# Altium PCB RF_v2.PcbDoc (part 3 of 4)
Units mm, origin at the board's own origin, x right, y up, seen from the top; angles counter-clockwise.
Board outline 203.1 x 72.1 mm, 2 copper layers (Top Layer, Bottom Layer), stack 1.535 mm thick; 384 components, 237 nets, 1087 pads, 1621 vias.
Unrouted connection lines stored in the file: 4.
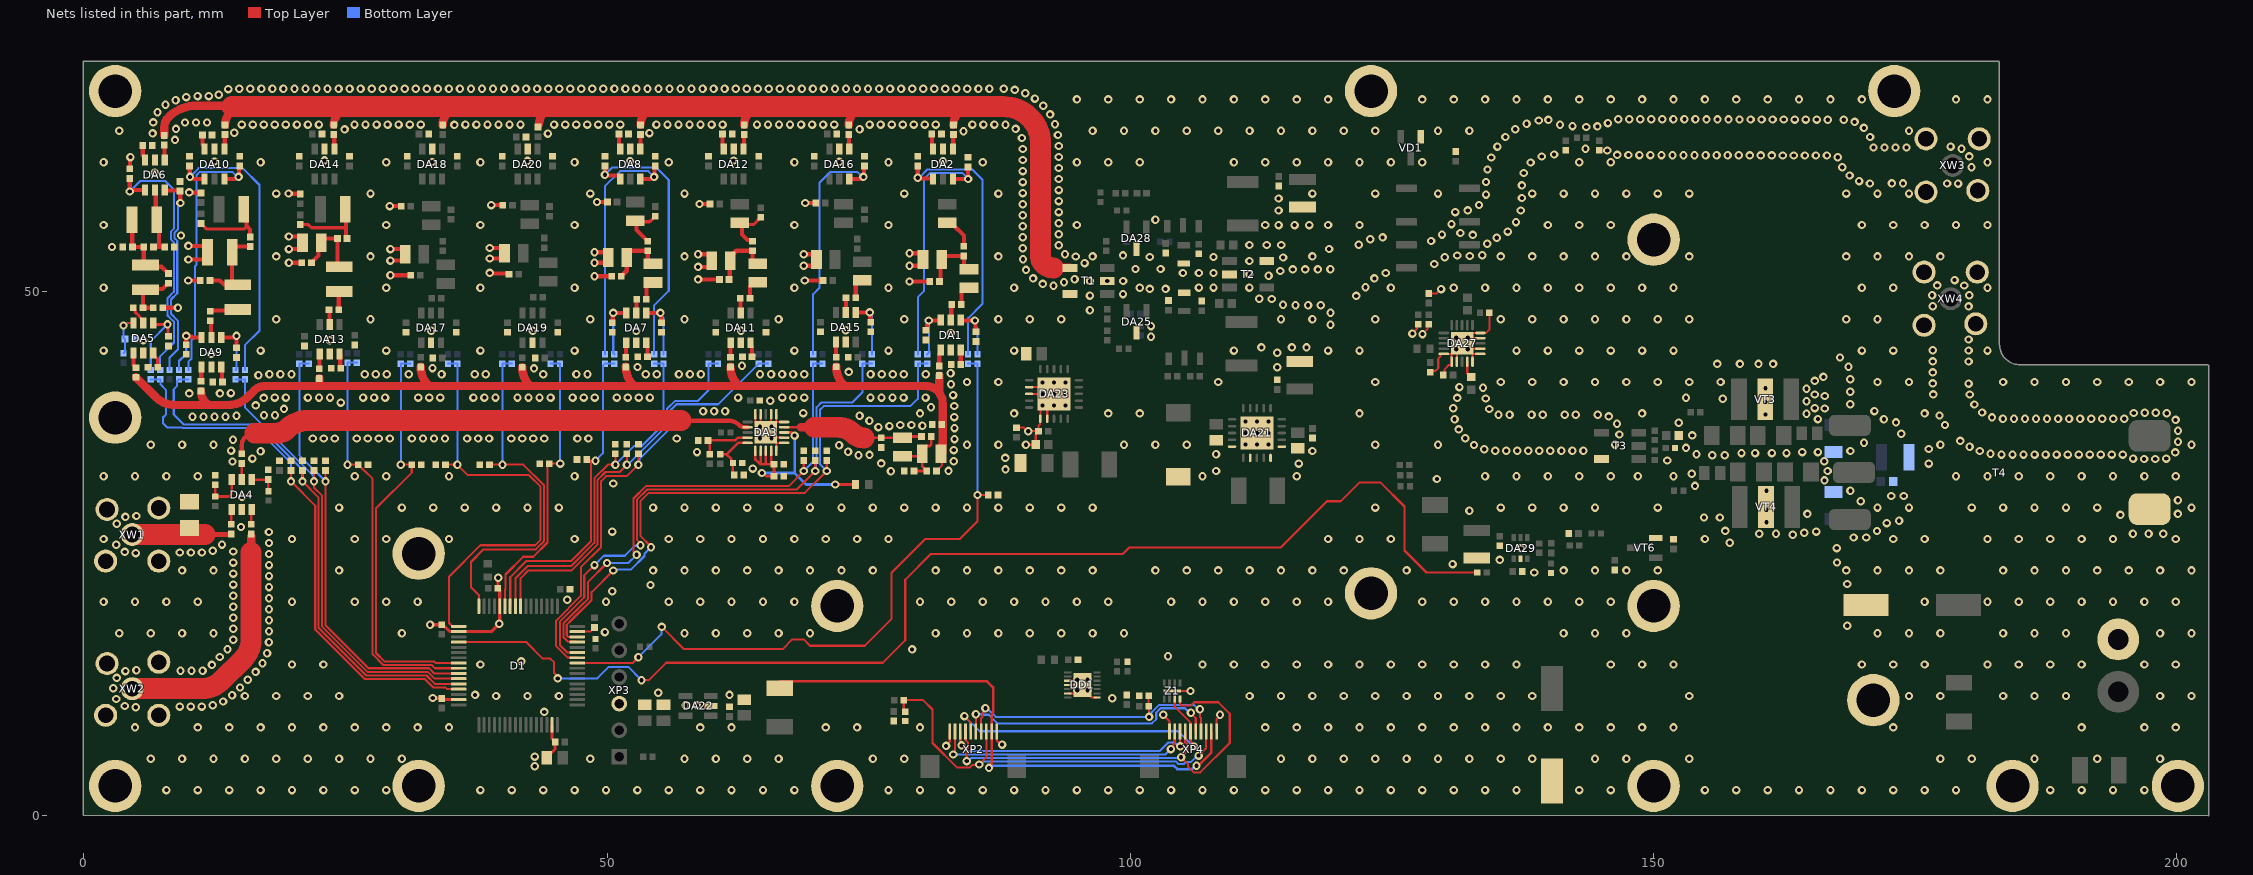
[diagram p2: the nets of this part, all layers, seen from the top]

## Via types
v1: diameter 0.8, hole 0.4, Top Layer to Bottom Layer, tented both sides, 1579 vias
v2: diameter 0.8, hole 0.4, Top Layer to Bottom Layer, 42 vias

## Nets (pads, with @x,y where several pads share a name; then routed paths per layer and width w, separated by ;. In a path a pad name is that pad's centre, name@x,y a point inside that pad or via, vN(x,y) a via of type N, cw(c..) or ccw(c..) an arc to the next point about the centre after c; other vN are vias at no path point) (continued)
BAND0_EN: C73.2 D1.29 R12.2 R15.1 | length 53.2
  Top Layer w0.2: C73.2@19.8,32.94 v1(19.8,31.9) 22.125,29.575 22.125,17.754 26.854,13.025 32.575,13.025 33.375,12.225 34.553,12.225 34.728,12.05 D1.29@35.83,12.05
  Bottom Layer w0.2: R12.2@6.4,41.65 R15.1@7.3,41.65 7.331,41.619 7.331,41.167 7.875,40.623 7.875,38.307 7.575,38.007 7.575,37.441 7.954,37.062 9.374,37.062 9.425,37.011 16.448,37.011 19.793,33.667 19.793,31.907 v1(19.8,31.9)
BAND1_DIS: C191.2 D1.28 R23.2 R24.1 | length 51.4
  Top Layer w0.2: C191.2@20.9,32.94 v1(20.9,31.9) 22.45,30.35 22.45,17.888 26.988,13.35 32.754,13.35 33.554,12.55 D1.28@35.83,12.55
  Bottom Layer w0.2: R24.1@10,41.65 R23.2@9.1,41.65 8.9,41.45 8.9,41 8.6,40.7 8.6,38.296 9.559,37.336 16.583,37.336 20.9,33.019 v1(20.9,31.9)
BAND1_EN: C74.2 D1.27 R19.2 R25.1 | length 43.7
  Top Layer w0.2: C74.2@22,32.94 22,31.3 22.775,30.525 22.775,18.023 27.098,13.7 32.878,13.7 33.528,13.05 D1.27@35.83,13.05
  Bottom Layer w0.2: R19.2@14.5,41.65 R25.1@15.4,41.65 15.4,38.979 21.944,32.434 21.944,31.956 v1(22,31.9)
BAND2_DIS: C192.2 D1.26 R72.2 R73.1 | length 42.6
  Top Layer w0.2: C192.2@23.1,32.94 v1(23.1,31.9) 23.1,18.158 27.208,14.05 33.003,14.05 33.503,13.55 D1.26@35.83,13.55
  Bottom Layer w0.2: R72.2@21.5,43.15 R73.1@20.6,43.15 20.6,34.4 v1(23.1,31.9)
BAND2_EN: C120.2 D1.25 R43.2 R74.1 | length 39.2
  Top Layer w0.2: v1(25.2,33.5) C120.2@26.24,33.5 26.615,33.125 26.615,33.087 26.747,32.955 26.785,32.955 27.6,32.14 27.6,15.367 28.592,14.375 33.225,14.375 33.55,14.05 D1.25@35.83,14.05
  Bottom Layer w0.2: v1(25.2,33.5) R74.1@25.2,43.25 R43.2@26.1,43.25
BAND3_DIS: C193.2 D1.24 R78.2 R79.1 | length 38.9
  Top Layer w0.2: v1(30.3,33.5) C193.2@31.34,33.5 31.34,32.74 27.925,29.325 27.925,15.502 28.727,14.7 33.471,14.7 33.621,14.55 D1.24@35.83,14.55
  Bottom Layer w0.2: 30.3,33.9 R79.1@30.3,43.15 R78.2@31.2,43.15
BAND3_EN: C184.2 D1.17 R76.2 R80.1 | length 41.3
  Top Layer w0.2: C184.2@34.56,33.5 v1(35.7,33.5) 36.7,32.5 42.54,32.5 43.659,31.381 43.659,26.331 43.129,25.8 37.9,25.8 34.9,22.8 34.9,18.375 35.225,18.05 D1.17@35.83,18.05
  Bottom Layer w0.2: R80.1@34.8,43.15 R76.2@35.7,43.15 v1(35.7,33.5)
BAND4_DIS: C194.2 D1.16 R82.2 R83.1 | length 34.3
  Top Layer w0.2: D1.16@37.75,19.97 37.75,21.05 37,21.8 37,24.2 38.2,25.4 43.188,25.4 43.984,26.196 43.984,31.516 42,33.5 v1(40.011,33.5) C194.2@38.771,33.5
  Bottom Layer w0.2: v1@40,33.5 R83.1@40,43.15 R82.2@40.9,43.15
BAND4_EN: C185.2 D1.11 R81.2 R84.1 | length 27.6
  Top Layer w0.2: D1.11@40.25,19.97 40.25,21.55 40.3,21.6 40.3,23 42,24.7 42.948,24.7 44.309,26.061 C185.2@44.309,33.6 ; C185.2@44.332,33.449 C185.2@44.483,33.6 v1(45.523,33.6)
  Bottom Layer w0.2: R84.1@44.6,43.15 R81.2@45.5,43.15 v1@45.5,33.6
BAND5_DIS: C195.2 D1.10 R17.2 R18.1 | length 31
  Top Layer w0.2: D1.10@40.75,19.97 40.75,22.75 42.3,24.3 46.6,24.3 48.46,26.16 48.46,33.881 48.179,33.881 C195.2@48.06,34 ; 48.48,33.881 v1(48.9,33.881)
  Bottom Layer w0.2: v1(48.9,33.881) 49.6,34.581 49.6,42.95 R18.1@49.8,43.15 R17.2@50.7,43.15
BAND5_EN: C186.2 D1.9 R16.2 R22.1 | length 34.3
  Top Layer w0.2: D1.9@41.25,19.97 41.25,22.65 42.4,23.8 46.56,23.8 48.785,26.025 48.785,32.185 50.1,33.5 v1(50.8,33.5) C186.2@50.8,34.54
  Bottom Layer w0.2: v1(50.8,33.5) 52.6,35.3 53.339,35.3 55.4,37.361 R16.2@55.4,43.15 R22.1@54.5,43.15
BAND6_DIS: C196.2 D1.8 R41.2 R42.1 | length 37.1
  Top Layer w0.2: D1.8@41.75,19.97 41.75,22.65 42.5,23.4 46.619,23.4 49.11,25.891 49.11,32.05 49.86,32.8 51.2,32.8 v1(51.9,33.5) C196.2@51.9,34.54
  Bottom Layer w0.2: v1(51.9,33.5) 51.998,33.5 55.725,37.227 55.725,38.812 56.508,39.596 58.696,39.596 59.7,40.6 R42.1@59.7,43.15 R41.2@60.6,43.15
BAND6_EN: C187.2 D1.58 R31.2 R70.1 | length 42.9
  Top Layer w0.2: D1.58@47.17,15.05 47.13,15.09 46.216,15.09 45.143,16.163 45.143,18.6 47.5,20.957 47.5,23.7 49.435,25.635 49.435,31.916 49.919,32.4 51.9,32.4 v1(53,33.5) C187.2@53,34.54
  Bottom Layer w0.2: v1(53,33.5) 53.086,33.586 53.086,34.03 56.05,36.995 56.05,38.678 56.643,39.271 60.621,39.271 R70.1@64.5,43.15 R31.2@65.4,43.15
BAND7_DIS: C197.2 D1.61 R21.1 R75.2 | length 48.9
  Top Layer w0.2: D1.61@47.161,16.559 47.13,16.59 46.268,16.59 45.826,17.032 45.826,18.328 47.604,20.106 48.2,20.702 48.2,22.3 v1(50,24.1) ; v1(52.825,24.9) 52.525,25.2 52.525,30.265 53.714,31.455 67.355,31.455 v1(68.8,32.9) C197.2@68.8,33.9
  Bottom Layer w0.2: v1(50,24.1) 52.025,24.1 v1(52.825,24.9) ; v1(68.8,32.9) 69.7,33.8 R21.1@69.7,43.15 R75.2@70.6,43.15
BAND7_EN: C188.2 D1.59 R20.2 R77.1 | length 54.6
  Top Layer w0.2: D1.59@47.17,15.55 46.216,15.55 45.501,16.264 45.501,18.499 47.825,20.822 47.825,22.925 v1(48.8,23.9) ; v1(53.2,25.8) 53.2,25.962 52.85,26.312 52.85,30.131 53.849,31.13 68.13,31.13 v1(69.9,32.9) C188.2@69.9,33.9
  Bottom Layer w0.2: v1(48.8,23.9) 49.7,24.8 51.7,24.8 52.655,25.755 53.155,25.755 v1(53.2,25.8) ; v1(69.9,32.9) 69.96,32.96 69.96,33.6 70.025,33.665 70.025,38.994 70.469,39.438 73.438,39.438 74.4,40.4 R77.1@74.4,43.15 R20.2@75.3,43.15
BAND8_DIS: C198.2 D1.62 R10.2 R11.2 | length 58.8
  Top Layer w0.2: D1.62@47.169,17.049 46.269,17.049 46.151,17.167 46.151,18.194 46.611,18.653 48.525,20.567 48.525,21.322 v1(50.592,23.389) ; v1(54.2,25.6) 54.2,25.684 53.189,26.694 53.189,30.011 53.983,30.805 68.905,30.805 v1(71,32.9) C198.2@71,33.9
  Bottom Layer w0.2: v1(50.592,23.389) 50.703,23.5 52.309,23.5 53.585,24.776 53.585,24.985 v1(54.2,25.6) ; v1(71,32.9) 70.35,33.55 70.35,38.735 70.703,39.087 78.987,39.087 79.7,39.8 R11.2@79.7,43.15 R10.2@80.6,43.15
BAND8_EN: C189.2 D1.57 R1.2 R2.2 | length 66.1
  Top Layer w0.2: D1.57@47.17,14.55 52.45,14.55 v1(53,15.1) ; v1(55.225,18) 57.35,15.875 66.775,15.875 67.7,16.8 68.8,16.8 69.4,16.2 74.64,16.2 77.2,18.76 77.2,23.2 80.4,26.4 83.7,26.4 85.4,28.1 v1(85.4,30.6) C189.2@86.44,30.6
  Bottom Layer w0.2: v1(53,15.1) 55.2,17.3 55.2,17.975 v1(55.225,18) ; R2.2@84.5,43.15 R1.2@85.4,43.15 v1(85.4,30.6)
BPF_IN: C1.2 C13.1 C20.2 C26.2 C31.2 C47.2 C62.2 C67.2 C72.2 C119.2 C170.2 L7.2 | length 99.8
  Top Layer w0.2: C13.1@81.484,32.893 81.992,33.401 L7.2@81.992,34.621
  Top Layer w0.8: C26.2@5,41.84 6.896,39.944 ccw(c8.692,41.74) 8.692,39.2 11.882,39.2 ; C47.2@11.2,40.54 ccw(c12.789,40.54) 11.665,39.417 11.882,39.2 ; 22.5,41.021 C72.2@22.5,41.74 ; C119.2@32.2,42.84 ccw(c34.66,42.84) 32.921,41.1 ; 32.921,41.1 33,41.021 ; C170.2@41.9,42.8 ccw(c44.36,42.8) 42.621,41.06 ; C31.2@51.8,42.84 ccw(c54.26,42.84) 52.521,41.1 ; C62.2@61.8,42.84 ccw(c64.26,42.84) 62.521,41.1 ; C67.2@71.9,42.85 ccw(c74.36,42.85) 72.621,41.11 ; 81.75,40.455 C1.2@81.75,42.015 ; L7.2@81.915,34.544 81.992,34.621 82.025,34.654 82.025,35.437 82.091,35.503 C20.2@82.091,37.239 ; C20.2@82.073,37.419 82.073,39.37 ccw(c80.422,39.37) 80.422,41.021 33,41.021 ; 11.882,39.2 13.848,39.2 ccw(c13.848,41.74) 15.644,39.944 16.3,40.6 cw(c17.316,39.584) 17.316,41.021 17.421,41.021 23.53,41.021 23.836,41.021 33,41.021
BPF_OUT: C4.1 C27.1 C34.1 C48.1 C52.1 C70.1 C75.1 C121.1 C171.1 T1.5 | length 112.1
  Top Layer w0.8: C27.1@7.7,64.96 7.7,65.734 cw(c9.066,65.734) 8.1,66.7 cw(c10.737,64.063) 10.737,67.792 13.506,67.792 13.975,67.324 13.975,67.107 ccw(c15.122,65.96) C48.1@13.5,65.96 ; C75.1@23.9,65.96 cw(c25.522,65.96) 24.375,67.107 ; C121.1@34.3,65.96 cw(c35.922,65.96) 34.775,67.107 ; C171.1@43.5,66 cw(c45.122,66) 43.975,67.147 ; C34.1@53.2,65.96 cw(c54.822,65.96) 53.675,67.107 ; C52.1@63.1,65.96 cw(c64.722,65.96) 63.575,67.107 ; C70.1@73.1,65.96 cw(c74.722,65.96) 73.575,67.107 ; C4.1@83.1,65.96 cw(c84.722,65.96) 83.575,67.107 ; 92.656,52.304 T1.5@94.242,52.304
  Top Layer w2: 14.178,67.71 24.375,67.71 34.775,67.71 43.975,67.71 53.675,67.71 63.575,67.71 73.575,67.71 83.575,67.71 87.89,67.71 cw(c87.89,64.16) 91.44,64.16 91.44,53.328 ccw(c92.328,53.328) 91.7,52.7 ccw(c92.656,53.656) 92.656,52.304
CON_RS422A: XP2.2 XP4.2 | length 25.1
  Top Layer w0.2: v1(83.082,5.801) 83.082,5.964 83.25,6.132 XP2.2@83.25,8 ; v1(103.875,6.325) 103.875,6.337 104.125,6.587 104.125,6.834 104.25,6.959 XP4.2@104.25,8
  Bottom Layer w0.2: v1(83.082,5.801) 103.339,5.801 103.863,6.325 v1(103.875,6.325)
CON_RS422B: XP2.3 XP4.3 | length 24.5
  Top Layer w0.2: XP2.3@83.725,8.025 XP2.3@83.75,8 83.75,6.962 83.875,6.837 v1(83.875,6.675) ; XP4.3@104.75,8 104.757,7.993 104.757,6.586 v1(104.764,6.579)
  Bottom Layer w0.2: v1(83.875,6.675) 84.424,6.126 102.792,6.126 103.616,6.95 104.231,6.95 104.602,6.579 v1(104.764,6.579)
CON_RS422Y: XP2.5 XP4.5 Z1.3 | length 30.2
  Top Layer w0.2: v1(84.15,9.475) 84.738,8.887 84.738,8.012 XP2.5@84.75,8 ; Z1.3@104.25,11.11 104.25,10.364 105.733,8.882 105.733,8.017 105.775,7.975 105.775,7.051 106.089,6.737 v1(106.089,6.575)
  Bottom Layer w0.2: v1(84.15,9.475) 85.6,8.025 104.564,8.025 106.014,6.575 v1(106.089,6.575)
CON_RS422Z: XP2.4 XP4.4 Z1.4 | length 41.6
  Top Layer w0.2: XP2.4@84.25,8 84.275,7.975 84.275,7.159 84.5,6.934 84.5,6.416 84.375,6.291 v1(84.375,5.176) ; Z1.4@104.75,11.11 104.75,10.617 104.867,10.5 105.8,10.5 106.1,10.8 108.4,10.8 109.5,9.7 109.5,6.9 106.7,4.1 106.066,4.1 105.528,4.638 105.528,4.872 104.875,5.525 v1@104.875,5.543 ; v1(104.859,5.543) v1@104.875,5.543 ; XP4.4@105.25,8 105.25,6.977 105.464,6.764 105.464,6.164 104.875,5.575 v1@104.875,5.543
  Bottom Layer w0.2: v1(84.375,5.176) 84.492,5.176 84.792,5.476 104.792,5.476 v1(104.859,5.543)
CON_TX_FAIL: R36.1 R37.1 XP2.8 XP4.8 | length 40.6
  Top Layer w0.2: R37.1@78.5,9.9 78.35,10.05 R36.1@78.35,11 80.2,11 81.1,10.1 81.1,6.899 83.448,4.551 84.634,4.551 84.875,4.792 85.516,4.792 v1(85.575,4.851) 86.25,5.526 XP2.8@86.25,8 ; v1(106.525,5.7) 107.25,6.425 XP4.8@107.25,8
  Bottom Layer w0.2: v1(85.575,4.851) 85.692,4.851 85.992,5.151 104.328,5.151 104.579,4.9 105.099,4.9 105.274,5.075 105.791,5.075 106.416,5.7 v1(106.525,5.7)
CON_TXON: R68.1 R69.1 XP2.7 XP4.7 | length 28.2
  Top Layer w0.2: XP2.7@85.75,8 85.75,9.266 85.875,9.391 85.875,9.808 86.15,10.083 v1(86.15,10.225) ; R69.1@101.757,11.419 R68.1@101.757,10.403 101.8,10.36 v1(101.8,9.4) ; v1(106.65,10.13) 106.65,9.399 106.75,9.299 XP4.7@106.75,8
  Bottom Layer w0.2: v1(86.15,10.225) 86.312,10.225 87.137,9.4 v1(101.8,9.4) 101.8,9.562 102.05,9.812 102.05,9.844 102.756,10.55 106.08,10.55 106.5,10.13 v1(106.65,10.13)
DAC_DRV: D1.20 R26.1 | length 117.7
  Top Layer w0.2: D1.20@35.83,16.55 42.29,16.55 43.868,14.972 44.584,14.972 44.95,14.606 44.95,13.587 45.3,13.237 v1(45.3,13.075) ; v1(53.3,12.9) 53.316,12.916 54,12.916 55.659,14.575 66.403,14.575 75.773,14.575 76.354,14.575 78.5,16.721 78.5,22.52 80.955,24.975 99.301,24.975 99.926,25.6 114.4,25.6 118.8,30 120.1,30 121.908,31.808 123.892,31.808 126.2,29.5 126.2,25.3 128.3,23.2 R26.1@133.15,23.2
  Bottom Layer w0.2: v1(45.3,13.075) 49.075,13.075 50.183,14.183 52.017,14.183 v1(53.3,12.9)
DRV_IN: C152.2 DA27.14 | length 1.8
  Top Layer w0.2: C152.2@132.25,42.175 132.55,41.875 C152.2@132.575,41.875
  Top Layer w0.25: DA27.14@132.199,43.335 132.199,42.226 C152.2@132.4,42.025
GND: C5.2 C6.1 C7.2 C8.2 C9.1 C10.1 C14.1 C15.1 C18.1 C19.1 C20.1 C21.2 C22.2 C23.2 C24.2 C25.2 C28.2 C30.1 C37.1 C38.1 C39.1 C40.1 C41.2 C42.2 C43.2 C44.2 C45.2 C46.1 C49.2 C55.1 C56.1 C57.2 C58.2 C59.2 C60.2 C61.1 C63.2 C64.2 C65.2 C66.2 C69.2 C71.1 C73.1 C74.1 C76.2 C77.2 C78.2 C81.1 C82.2 C83.2 C84.2 C85.2 C86.1 C87.2 C88.2 C89.2 C91.1 C92.2 C93.1 C94.1 C95.1 C96.1 C97.1 C98.2 C99.2 C100.1 C101.1 C102.1 C103.1 C104.1 C105.1 C106.1 C107.1 C108.1 C109.1 C110.1 C111.1 C112.1 C113.1 C114.1 C115.2 C116.2 C117.2 C118.1 C120.1 C122.1 C123.2 C125.2 C129.2 C130.2 C133.1 C134.1 C136.1 C137.1 C138.1 C140.1 C141.1 C144.1 C145.1 C147.2 C148.2 C149.1 C150.2 C151.2 C153.1 C154.1 C156.2 C157.1 C158.1 C161.1 C162.1 C163.2 C164.2 C165.1 C166.2 C167.2 C168.2 C169.2 C172.2 C175.1 C176.1 C177.2 C178.2 C179.2 C180.2 C184.1 C185.1 C186.1 C187.1 C188.1 C189.1 C190.1 C191.1 C192.1 C193.1 C194.1 C195.1 C196.1 C197.1 C198.1 C199.1 C201.1 C204.1 C205.1 C207.1 C208.2 C209.2 C210.2 D1.12 D1.18 D1.31 D1.47 D1.63 DA1.2 DA2.2 DA3.10 DA3.11 DA3.12 DA3.15 DA3.16 DA3.17 DA3.19 DA3.20 DA3.21 DA4.2 DA5.2 DA6.2 DA7.2 DA8.2 DA9.2 DA10.2 DA11.2 DA12.2 DA13.2 DA14.2 DA15.2 DA16.2 DA17.2 DA18.2 DA19.2 DA20.2 DA21.5 DA21.7 DA21.10 DA21.11 DA21.21 DA22.2 DA23.7 DA23.8 DA23.11 DA23.12 DA23.21 DA25.3 DA27.10 DA27.11 DA27.12 DA27.15 DA27.16 DA27.17 DA27.19 DA27.20 DA27.21 DA28.3 DA29.2 DD1.3 DD1.4 DD1.6 DD1.8 DD1.15 L4.1 L12.1 L14.2 L17.2 L22.2 L23.1 L26.2 L29.2 pad.1 R3.1 R7.2 R33.1 R37.2 R38.2 R40.2 R47.2 R48.1 R49.1 R50.1 R55.2 R63.2 R67.2 R69.2 R71.2 T1.2 T1.4 T2.2 T2.4 T3.4 T4.5 VD1.1 VT3.2 VT4.2 VT6.2 XP1.2 XP2.1 XP2.6 XP2.10 XP3.3 XP4.1 XP4.6 XP4.10 XW1.2 XW2.2 XW3.2 XW4.2 Z1.9 | length 152
  Top Layer w0.2: D1.63@47.17,17.55 48.41,17.55 C109.1@48.8,17.94 ; DA3.20@64.177,38.326 64.177,37.576 v2(64.627,37.126) 64.677,37.176 DA3.19@64.677,38.326 ; DA3.17@65.677,38.326 65.677,37.176 v2(65.727,37.126) ; v2(65.727,36.026) 65.777,36.076 DA3.12@66.927,36.076 ; DA3.10@66.177,34.826 66.177,35.576 DA3.11@66.927,35.576 ; DA3.16@66.177,38.326 66.177,37.576 DA3.15@66.927,37.576 ; v1(82.4,6.625) 82.4,6.669 82.75,7.019 XP2.1@82.75,8 ; XP2.6@85.25,8 v1(85.25,9.65) ; XP2.10@87.25,8 87.262,7.988 87.262,7.113 87.624,6.751 v1(87.75,6.751) ; C105.1@89.125,37.035 89.833,37.035 90.168,36.7 v1(90.25,36.7) 90.253,36.703 C103.1@91.234,36.703 ; v1(90.019,35.402) 90.936,35.402 C102.1@90.967,35.433 90.967,36.436 C103.1@91.234,36.703 ; DA23.8@90.335,40.259 v2(91.61,40.259) ; DA23.7@90.335,40.909 92.06,40.909 v2(92.71,40.259) ; DA23.12@92.06,37.884 92.06,38.784 91.685,39.159 v2(91.61,39.159) 91.41,38.959 DA23.11@91.41,37.884 91.41,37.595 91.375,37.56 91.375,37.35 91.234,37.209 C103.1@91.234,36.703 ; DD1.6@94.03,11.65 94.68,11.65 94.925,11.895 v2(94.925,11.95) ; DD1.4@94.03,12.45 DD1.15@95.425,12.45 ; DD1.3@94.03,12.85 94.825,12.85 v2(94.925,12.95) ; v2(95.925,11.95) 95.925,11.645 96.17,11.4 96.175,11.4 96.325,11.25 DD1.8@96.82,11.25 ; v1(103.15,9.6) 103.75,9 XP4.1@103.75,8 ; Z1.9@104,11.875 v1(105.75,11.875) ; v1(105.788,9.794) 105.788,9.727 106.25,9.266 XP4.6@106.25,8 ; XP4.10@108.25,8 108.25,9.183 108.575,9.508 v1(108.575,9.6) ; v1(126.95,46.025) 127.394,46.469 127.394,46.807 R55.2@127.508,46.921 ; v1(127.925,45.975) 128.39,46.44 128.39,46.777 C141.1@128.524,46.911 ; C140.1@128.524,49.863 129.288,49.863 v1(129.7,50.275) ; C138.1@128.651,42.339 128.766,42.454 129.154,42.454 129.425,42.725 129.425,43.625 129.629,43.829 129.629,44.062 129.652,44.085 DA27.10@129.949,44.085 130.699,44.085 DA27.11@130.699,43.335 130.699,43.04 130.676,43.016 130.441,43.016 130.003,42.578 130.003,42.163 C137.1@129.915,42.075 ; v2(131.149,44.535) 131.199,44.485 DA27.12@131.199,43.335 ; v2(132.249,44.535) 132.299,44.585 DA27.17@133.449,44.585 ; DA27.15@132.699,43.335 132.699,44.085 DA27.16@133.449,44.085 ; DA27.19@133.449,45.585 132.299,45.585 v2(132.249,45.635) 132.699,46.085 DA27.20@133.449,46.085 133.459,46.095 133.995,46.095 134.308,46.408 R49.1@134.308,48.006
  Top Layer w0.3: v1(33.35,11.2) 33.37,11.18 34.18,11.18 34.3,11.06 35.82,11.06 D1.31@35.83,11.05 ; C111.1@34.2,18.211 34.195,18.206 33.106,18.206 v1(33.1,18.2) 34.32,18.2 34.96,17.56 35.82,17.56 D1.18@35.83,17.55 38.95,17.55 39.75,18.35 D1.12@39.75,19.97 39.75,21.51 C112.1@39.56,21.7 39.58,21.72 39.58,22.68 v1(39.6,22.7) ; C106.1@44.25,5.5 44.25,5.65 44.6,6 44.711,6 45.04,6.329 C107.1@45.04,7 44.75,7.29 D1.47@44.75,8.63
  Top Layer w0.4: C45.2@4.427,61.787 v1@4.427,62.858 ; C38.1@7.56,48.5 v1(9,48.5) ; v1(9.993,51.1) C61.1@11.14,51.1 ; v1(10,53.1) 11.51,53.1 11.82,53.41 L14.2@11.82,53.8 11.82,54.09 11.51,54.4 v1(10,54.4) ; v1@10.102,59.487 C145.1@11.173,59.487 ; v1(19.574,59.415) 19.602,59.387 20.673,59.387 C201.1@20.7,59.36 ; v1(19.6,52.8) C86.1@20.84,52.8 ; v1(19.6,54.1) 20.6,54.1 20.91,54.41 L17.2@20.91,54.7 20.91,54.99 20.6,55.3 v1(19.6,55.3) ; v1(29.24,58.2) C205.1@30.34,58.2 ; v1(29.3,51.6) C165.1@31.24,51.6 ; v1(29.3,53) 30.4,53 30.71,53.31 30.71,53.79 30.4,54.1 v1(29.3,54.1) ; v1(38.8,51.819) 38.86,51.76 40.58,51.76 C176.1@40.64,51.7 ; v1(38.8,53.2) 39.9,53.2 40.21,53.51 40.21,53.89 39.9,54.2 v1(38.8,54.2) ; v1(38.94,58.3) C207.1@40.04,58.3 ; v1(48.8,51.5) C37.1@50.44,51.5 ; v1(48.8,52.8) 49.8,52.8 50.11,53.11 50.11,53.49 49.8,53.8 v1(48.8,53.8) ; v1(49.04,58.6) C136.1@50.04,58.6 ; v1(58.7,51.2) C56.1@60.74,51.2 ; v1(58.7,52.4) 59.7,52.4 60.01,52.71 L23.1@60.01,53 60.01,53.29 59.7,53.6 v1(58.7,53.6) ; v1(58.84,58.4) C199.1@59.84,58.4 ; v1(68.8,52.5) 69.7,52.5 70.01,52.81 L22.2@70.01,53.1 70.01,53.29 69.7,53.6 v1(68.8,53.6) ; v1(68.9,51.1) C161.1@70.64,51.1 ; v1(68.94,58.5) C204.1@69.94,58.5 ; v1(78.9,51) C6.1@80.84,51 ; v1(78.9,52.5) 79.89,52.5 80.2,52.81 L4.1@80.2,53.1 80.2,53.39 79.89,53.7 v1(78.9,53.7)
  Bottom Layer w0.2: v1(85.25,9.65) 85.841,9.65 85.891,9.6 86.478,9.6 87.303,8.775 102.059,8.775 102.475,9.191 102.475,9.809 102.891,10.225 105.23,10.225 105.661,9.794 v1(105.788,9.794)
  Bottom Layer w0.5: pad.1@2.8,38 pad.1@4.018,38
  other v1: 7.9,2.4 10.9,2.4 13.9,2.4 16.9,2.4 19.9,2.4 22.9,2.4 25.9,2.4 28.9,2.4 37.9,2.4 40.9,2.4 43.9,2.4 46.9,2.4 49.9,2.4 52.9,2.4 55.9,2.4 58.9,2.4 61.9,2.4 64.9,2.4 67.9,2.4 76.9,2.4 79.9,2.4 82.9,2.4 85.9,2.4 88.9,2.4 91.9,2.4 94.9,2.4 97.9,2.4 100.9,2.4 103.9,2.4 106.9,2.4 109.9,2.4 112.9,2.4 115.9,2.4 118.9,2.4 121.9,2.4 124.9,2.4 127.9,2.4 130.9,2.4 133.9,2.4 136.9,2.4 142.9,2.4 145.9,2.4 154.9,2.4 157.9,2.4 160.9,2.4 163.9,2.4 166.9,2.4 169.9,2.4 172.9,2.4 175.9,2.4 178.9,2.4 187.9,2.4 190.9,2.4 193.9,2.4 196.9,2.4 43.1,4.675 6.4,5.4 9.4,5.4 12.4,5.4 15.4,5.4 18.4,5.4 21.4,5.4 24.4,5.4 27.4,5.4 30.4,5.4 48.4,5.4 57.4,5.4 60.4,5.4 63.4,5.4 66.4,5.4 75.4,5.4 78.4,5.4 114.4,5.4 117.4,5.4 120.4,5.4 123.4,5.4 126.4,5.4 129.4,5.4 132.4,5.4 135.4,5.4 138.4,5.4 144.4,5.4 147.4,5.4 153.4,5.4 177.4,5.4 180.4,5.4 186.4,5.4 192.4,5.4 198.4,5.4 43.1,5.6 4.9,8.4 10.9,8.4 13.9,8.4 16.9,8.4 19.9,8.4 22.9,8.4 25.9,8.4 28.9,8.4 31.9,8.4 34.9,8.4 58.9,8.4 61.9,8.4 70.9,8.4 73.9,8.4 79.9,8.4 112.9,8.4 115.9,8.4 118.9,8.4 121.9,8.4 124.9,8.4 127.9,8.4 130.9,8.4 133.9,8.4 136.9,8.4 139.9,8.4 142.9,8.4 145.9,8.4 148.9,8.4 151.9,8.4 172.9,8.4 190.9,8.4 196.9,8.4 199.9,8.4 44.009,9.875 4.963,10.314 9.177,10.377 10.231,10.377 11.285,10.377 3.916,10.434 57.5,10.5 58.6,10.5 12.331,10.503 13.321,10.866 3.109,11.113 98.275,11.175 15.4,11.4 18.4,11.4 21.4,11.4 24.4,11.4 39.4,11.4 42.4,11.4 45.4,11.4 111.4,11.4 114.4,11.4 117.4,11.4 120.4,11.4 123.4,11.4 126.4,11.4 129.4,11.4 132.4,11.4 135.4,11.4 138.4,11.4 153.4,11.4 174.4,11.4 177.4,11.4 183.4,11.4 186.4,11.4 189.4,11.4 198.4,11.4 201.4,11.4 14.181,11.475 37.4,11.5 61.7,11.5 54.9,11.7 2.824,12.127 14.936,12.211 15.681,12.956 3.152,13.129 16.426,13.701 3.983,13.778 9.249,13.807 10.303,13.807 11.357,13.808 5.034,13.858 12.247,14.372 19.9,14.4 22.9,14.4 37.9,14.4 106.9,14.4 109.9,14.4 112.9,14.4 115.9,14.4 118.9,14.4 121.9,14.4 124.9,14.4 127.9,14.4 130.9,14.4 133.9,14.4 136.9,14.4 145.9,14.4 148.9,14.4 151.9,14.4 169.9,14.4 172.9,14.4 175.9,14.4 181.9,14.4 184.9,14.4 187.9,14.4 190.9,14.4 196.9,14.4 199.9,14.4 17.076,14.531 41.8,14.7 12.992,15.117 103.6,15.2 17.519,15.488 79.15,15.85 13.738,15.863 17.696,16.527 14.279,16.767 3.4,17.4 6.4,17.4 9.4,17.4 12.4,17.4 30.4,17.4 57.4,17.4 60.4,17.4 63.4,17.4 66.4,17.4 69.4,17.4 81.4,17.4 84.4,17.4 87.4,17.4 90.4,17.4 93.4,17.4 96.4,17.4 99.4,17.4 141.4,17.4 144.4,17.4 147.4,17.4 171.4,17.4 174.4,17.4 177.4,17.4 183.4,17.4 186.4,17.4 189.4,17.4 198.4,17.4 201.4,17.4 49.8,17.5 17.709,17.581 14.279,17.821 168.5,18.1 39.7,18.3 17.709,18.635 14.279,18.875 17.709,19.689 14.279,19.929 1.9,20.4 4.9,20.4 7.9,20.4 10.9,20.4 19.9,20.4 25.9,20.4 28.9,20.4 31.9,20.4 49.9,20.4 55.9,20.4 58.9,20.4 61.9,20.4 64.9,20.4 67.9,20.4 79.9,20.4 82.9,20.4 85.9,20.4 88.9,20.4 91.9,20.4 94.9,20.4 97.9,20.4 103.9,20.4 106.9,20.4 109.9,20.4 112.9,20.4 115.9,20.4 118.9,20.4 127.9,20.4 130.9,20.4 133.9,20.4 136.9,20.4 139.9,20.4 142.9,20.4 145.9,20.4 175.9,20.4 181.9,20.4 184.9,20.4 187.9,20.4 190.9,20.4 193.9,20.4 196.9,20.4 199.9,20.4 46.2,20.6 17.709,20.743 14.279,20.983 50.5,21.4 17.709,21.797 54.15,22 14.279,22.037 168.5,22.1 17.709,22.851 14.279,23.091 138.6,23.2 9.4,23.4 12.4,23.4 24.4,23.4 54.4,23.4 57.4,23.4 60.4,23.4 63.4,23.4 66.4,23.4 69.4,23.4 72.4,23.4 75.4,23.4 81.4,23.4 84.4,23.4 87.4,23.4 90.4,23.4 93.4,23.4 96.4,23.4 102.4,23.4 105.4,23.4 108.4,23.4 111.4,23.4 114.4,23.4 117.4,23.4 120.4,23.4 126.4,23.4 141.4,23.4 144.4,23.4 147.4,23.4 150.4,23.4 168.4,23.4 171.4,23.4 174.4,23.4 177.4,23.4 183.4,23.4 186.4,23.4 189.4,23.4 192.4,23.4 195.4,23.4 198.4,23.4 201.4,23.4 17.709,23.905 130.8,24 14.279,24.145 167.525,24.15 135.3,24.4 17.709,24.959 4.969,25.047 9.183,25.109 10.237,25.109 11.291,25.109 3.921,25.164 14.279,25.199 12.331,25.28 137.3,25.5 167.5,25.525 3.112,25.839 13.209,25.863 17.709,26.013 157.27,26.045 1.9,26.4 19.9,26.4 25.9,26.4 28.9,26.4 34.9,26.4 46.9,26.4 55.9,26.4 58.9,26.4 61.9,26.4 64.9,26.4 67.9,26.4 70.9,26.4 73.9,26.4 76.9,26.4 118.9,26.4 121.9,26.4 124.9,26.4 154.9,26.4 172.9,26.4 175.9,26.4 181.9,26.4 184.9,26.4 187.9,26.4 190.9,26.4 193.9,26.4 199.9,26.4 169.116,26.534 170.316,26.543 163.3,26.8 160.1,26.9 161.7,26.9 195.8,26.9 197.3,26.9 198.7,26.9 164.4,27 17.69,27.067 50.5,27.1 165.537,27.103 171.345,27.16 156.855,27.172 15.026,27.539 3.148,27.856 172.275,27.919 160.8,28 173.456,28.134 154.813,28.448 156.337,28.448 3.977,28.507 5.027,28.592 194.6,28.7 164.7,28.8 200.1,28.8 132.4,29.1 160.8,29.2 24.4,29.4 30.4,29.4 33.4,29.4 36.4,29.4 39.4,29.4 42.4,29.4 45.4,29.4 54.4,29.4 57.4,29.4 60.4,29.4 63.4,29.4 66.4,29.4 69.4,29.4 72.4,29.4 75.4,29.4 78.4,29.4 81.4,29.4 84.4,29.4 87.4,29.4 90.4,29.4 93.4,29.4 96.4,29.4 123.4,29.4 135.4,29.4 138.4,29.4 141.4,29.4 144.4,29.4 150.4,29.4 171.4,29.4 174.4,29.4 180.4,29.4 183.4,29.4 186.4,29.4 189.4,29.4 192.4,29.4 201.4,29.4 169.8,30 200.1,30.1 15.125,30.425 172.7,30.5 173.9,30.5 160.8,31 168.8,31 153.957,31.469 50.6,31.7 166.325,32 129.296,32.135 1.9,32.4 4.9,32.4 7.9,32.4 10.9,32.4 25.9,32.4 28.9,32.4 34.9,32.4 46.9,32.4 106.9,32.4 115.9,32.4 133.9,32.4 136.9,32.4 139.9,32.4 142.9,32.4 145.9,32.4 148.5,32.4 151.9,32.4 178.9,32.4 181.9,32.4 184.9,32.4 187.9,32.4 190.9,32.4 193.9,32.4 196.9,32.4 199.9,32.4 153.644,32.627 77.125,32.875 82.633,32.903 108.2,32.9 166.625,32.9 88.075,33.05 63.925,33.125 116.1,33.6 176.3,33.6 76.2,33.625 14.22,33.798 83.131,33.832 166.309,33.827 151.3,33.9 196.872,34.037 197.926,34.037 16.114,34.082 195.819,34.081 198.979,34.08 88.05,34.15 74.029,34.391 155.6,34.4 156.8,34.4 75.082,34.43 183.242,34.458 184.296,34.46 185.35,34.46 186.404,34.46 187.458,34.46 188.512,34.46 189.566,34.46 190.62,34.46 191.674,34.46 192.728,34.46 193.782,34.46 194.836,34.46 108.2,34.5 154.1,34.5 182.191,34.548 158.4,34.6 159.7,34.6 161.3,34.6 162.7,34.6 199.851,34.673 58.6,34.7 164.2,34.7 165.7,34.7 73.035,34.741 16.899,34.785 117.4,34.8 168.8,34.8 181.169,34.802 134.863,34.835 135.917,34.835 136.971,34.835 138.025,34.835 139.079,34.835 140.133,34.835 141.187,34.835 142.241,34.835 143.295,34.835 14.079,34.842 83.139,34.886 133.818,34.972 176.3,35 153.1,35.1 180.198,35.212 72.175,35.351 132.846,35.379 6.4,35.4 9.4,35.4 12.4,35.4 84.4,35.4 87.4,35.4 99.4,35.4 102.4,35.4 105.4,35.4 123.4,35.4 129.4,35.4 146.31,35.416 177.4,35.4 201.4,35.4 170.1,35.6 200.113,35.694 179.302,35.767 14.259,35.881 83.205,35.938 21.874,36.002 22.928,36.002 23.982,36.002 26.09,36.002 27.144,36.002 28.198,36.002 29.252,36.002 31.36,36.002 32.414,36.002 33.468,36.002 34.522,36.002 36.63,36.002 37.684,36.002 38.738,36.002 40.846,36.002 41.9,36.002 42.954,36.002 44.008,36.002 47.17,36.002 48.224,36.002 56.656,36.002 132.01,36.021 153.7,36.3 146.729,36.383 173.656,36.447 200.113,36.748 131.38,36.866 83.205,36.992 75.929,37.086 76.978,37.184 80.133,37.221 78.027,37.285 79.081,37.285 177.849,37.285 146.505,37.413 152.4,37.5 173.167,37.543 75.068,37.694 199.883,37.777 130.991,37.846 165.701,37.856 172.005,37.84 183.379,37.89 184.433,37.89 185.487,37.89 186.541,37.89 187.595,37.89 188.649,37.89 189.703,37.89 190.757,37.89 191.811,37.89 192.865,37.89 193.919,37.89 194.973,37.89 182.333,38.021 83.187,38.045 10.388,38.086 11.442,38.086 12.496,38.086 13.55,38.086 145.716,38.112 14.601,38.171 74.131,38.178 177.32,38.196 17.223,38.215 18.277,38.215 135.187,38.265 136.241,38.265 138.349,38.265 139.403,38.265 141.511,38.265 142.565,38.265 144.673,38.265 160.7,38.3 164.611,38.358 79.9,38.4 88.9,38.4 97.9,38.4 100.9,38.4 121.9,38.4 148.9,38.4 175.9,38.4 199.036,38.404 68.752,38.422 195.876,38.433 196.93,38.463 197.984,38.463 181.387,38.485 59.178,38.61 60.232,38.61 61.286,38.61 171.094,38.621 134.29,38.818 19.134,38.828 166.352,38.864 130.865,38.892 165.4,38.9 80.959,38.984 83.187,39.099 16.437,39.161 180.655,39.243 168.783,39.269 24.556,39.431 160.7,39.5 164.611,39.558 65.6,39.6 156.6,39.8 133.963,39.82 17.205,39.882 131.233,39.88 18.259,39.907 19.313,39.907 21.421,39.907 22.475,39.907 23.529,39.907 26.691,39.907 27.745,39.907 28.799,39.907 31.961,39.907 33.015,39.907 34.069,39.907 37.231,39.907 38.285,39.907 39.339,39.907 41.447,39.907 42.501,39.907 43.555,39.907 44.609,39.907 46.717,39.907 47.771,39.907 48.825,39.907 50.933,39.907 51.987,39.907 53.041,39.907 54.095,39.907 62.527,39.907 66.743,39.907 67.797,39.907 68.851,39.907 75.175,39.907 76.229,39.907 77.283,39.907 78.337,39.907 80.445,39.904 153.1,39.9 166.352,40.064 83.067,40.147 165.4,40.2 176.72,40.21 180.214,40.2 10.087,40.314 13.011,40.314 14.065,40.333 168.783,40.469 164.611,40.758 160.7,40.8 133.706,40.842 131.444,40.913 82.864,41.181 180.102,41.248 176.672,41.263 84.4,41.4 87.4,41.4 108.4,41.4 123.4,41.4 135.4,41.4 138.4,41.4 141.4,41.4 144.4,41.4 147.4,41.4 150.4,41.4 153.4,41.4 156.4,41.4 171.4,41.4 174.4,41.4 183.4,41.4 186.4,41.4 189.4,41.4 192.4,41.4 195.4,41.4 198.4,41.4 201.4,41.4 165.4,41.5 168.783,41.669 166.227,41.884 16.688,42.051 17.739,42.135 18.793,42.135 19.847,42.135 26.848,42.135 27.902,42.135 28.956,42.135 31.064,42.135 34.194,42.135 37.356,42.135 38.41,42.135 43.914,42.135 47.076,42.135 48.13,42.135 53.701,42.135 54.755,42.135 56.863,42.135 57.917,42.135 58.971,42.135 64.624,42.135 65.678,42.135 66.732,42.135 67.786,42.135 68.84,42.135 75.189,42.135 76.243,42.135 77.297,42.135 78.351,42.135 80.459,42.133 82.834,42.234 176.672,42.317 73.106,42.363 43.022,42.697 33.323,42.729 114.046,42.799 52.913,42.834 168.621,42.857 62.902,42.95 156.083,43.125 158.242,43.125 160.02,43.125 161.417,43.125 180.102,43.356 176.672,43.371 167.809,43.741 12.2,44.075 114.046,44.196 1.9,44.4 16.9,44.4 28.9,44.4 37.9,44.4 46.9,44.4 67.9,44.4 76.9,44.4 88.9,44.4 109.9,44.4 118.9,44.4 121.9,44.4 136.9,44.4 139.9,44.4 142.9,44.4 145.9,44.4 148.9,44.4 151.9,44.4 169.9,44.4 172.9,44.4 180.102,44.41 181.9,44.4 176.672,44.425 112.522,44.704 115.443,44.704 116.84,44.704 5.7,45.4 23.5,45.4 180.102,45.464 101.981,45.72 82.85,46.075 33.2,46.3 42.9,46.3 52.8,46.3 62.8,46.3 72.8,46.35 101.981,46.736 119.126,46.863 18.4,47.4 27.4,47.4 48.4,47.4 57.4,47.4 66.4,47.4 78.4,47.4 87.4,47.4 90.4,47.4 93.4,47.4 114.4,47.4 117.4,47.4 123.4,47.4 135.4,47.4 138.4,47.4 141.4,47.4 144.4,47.4 147.4,47.4 150.4,47.4 153.4,47.4 168.4,47.4 171.4,47.4 119.126,48.006 96.139,48.26 180.102,48.626 176.672,48.641 115.789,48.724 116.989,48.724 118.189,48.724 114.59,48.78 113.521,49.325 112.321,49.353 121.598,49.625 96.139,49.657 176.61,49.693 180.166,49.678 99.3,49.8 101.854,50.292 103.378,50.292 1.9,50.4 28.9,50.4 37.9,50.4 46.9,50.4 67.9,50.4 76.9,50.4 88.9,50.4 100.9,50.4 124.9,50.4 130.9,50.4 133.9,50.4 136.9,50.4 139.9,50.4 142.9,50.4 145.9,50.4 148.9,50.4 151.9,50.4 169.9,50.4 172.9,50.4 181.9,50.4 106.553,50.419 107.95,50.419 111.379,50.419 122.472,50.447 92.664,50.588 177.097,50.627 179.687,50.617 91.626,50.773 93.662,50.926 96.139,51.054 97.79,51.054 99.314,51.054 178.766,51.13 94.675,51.218 90.711,51.296 123.321,51.296 113.219,51.553 111.379,51.689 105.029,51.816 106.553,51.816 107.95,51.816 124.404,51.812 114.329,52.008 90.039,52.108 115.52,52.154 116.72,52.154 117.92,52.154 119.12,52.167 100.5,52.2 102.9,52.2 129.035,52.676 95.638,52.759 111.379,52.959 89.742,53.119 114.6,53.3 130.049,53.317 101.854,53.34 107.95,53.34 18.4,53.4 27.4,53.4 57.4,53.4 87.4,53.4 94.794,53.39 96.4,53.4 117.4,53.4 135.4,53.4 138.4,53.4 141.4,53.4 144.4,53.4 147.4,53.4 153.4,53.4 168.4,53.4 171.4,53.4 174.4,53.4 177.4,53.4 132.437,53.438 99.3,53.5 131.238,53.482 133.635,53.507 93.762,53.606 118.999,54.102 89.725,54.173 2.7,54.3 93.155,54.467 111.379,54.483 113.03,54.483 114.427,54.483 121.837,54.521 134.112,54.608 128.745,54.876 122.923,55.032 135.019,55.179 89.725,55.227 124.109,55.214 9.3,55.4 132.725,55.451 129.782,55.481 93.155,55.521 131.54,55.638 136.063,55.772 89.725,56.281 1.9,56.4 28.9,56.4 37.9,56.4 46.9,56.4 67.9,56.4 76.9,56.4 94.9,56.4 112.9,56.4 114.173,56.388 115.697,56.388 117.094,56.388 118.9,56.4 121.9,56.4 139.9,56.4 142.9,56.4 145.9,56.4 169.9,56.4 172.9,56.4 175.9,56.4 178.9,56.4 181.9,56.4 130.688,56.483 93.155,56.575 136.848,56.679 102.4,56.9 89.725,57.335 93.155,57.629 131.047,57.629 114.173,57.785 132.235,57.795 137.306,57.788 133.32,58.309 89.725,58.389 93.155,58.683 114.173,58.928 137.415,58.983 133.985,59.308 18.4,59.4 27.4,59.4 48.4,59.4 57.4,59.4 78.4,59.4 87.4,59.4 117.4,59.4 123.4,59.4 129.4,59.4 138.4,59.4 141.4,59.4 144.4,59.4 147.4,59.4 150.4,59.4 153.4,59.4 168.4,59.4 171.4,59.4 174.4,59.4 89.725,59.443 10.074,59.515 93.155,59.737 137.415,60.183 178.042,60.359 179.096,60.356 170.664,60.364 172.772,60.375 173.826,60.375 89.725,60.497 133.987,60.508 169.635,60.591 93.155,60.791 168.726,61.124 137.592,61.37 6.8,61.4 89.725,61.551 134.129,61.699 93.155,61.845 168.026,61.912 180.374,61.917 138.253,62.371 1.9,62.4 16.9,62.4 28.9,62.4 37.9,62.4 46.9,62.4 55.9,62.4 67.9,62.4 76.9,62.4 85.9,62.4 94.9,62.4 97.9,62.4 100.9,62.4 109.9,62.4 112.9,62.4 115.9,62.4 118.9,62.4 121.9,62.4 124.9,62.4 127.9,62.4 142.9,62.4 145.9,62.4 181.9,62.4 33.3,62.425 72.2,62.426 12.5,62.464 52.2,62.5 82.1,62.5 42.4,62.525 23,62.571 62.1,62.564 89.725,62.605 134.488,62.844 4.455,62.886 93.155,62.899 167.604,62.878 139.307,62.944 180.167,62.951 158.129,63.055 159.183,63.053 160.237,63.05 161.291,63.048 162.345,63.045 163.399,63.042 164.453,63.04 165.507,63.037 166.561,63.034 148.643,63.079 149.697,63.077 150.751,63.074 151.805,63.071 152.859,63.069 153.913,63.066 154.967,63.063 156.021,63.061 157.075,63.058 146.535,63.1 147.589,63.082 140.493,63.132 145.568,63.517 89.725,63.659 143.489,63.679 179.418,63.693 171.007,63.805 172.061,63.805 173.115,63.805 174.169,63.805 135.075,63.891 178.382,63.886 93.155,63.953 8.724,64.534 89.637,64.709 135.844,64.812 170.69,64.81 93.081,65.004 44.349,65.129 6.586,65.15 54.051,65.182 14.38,65.22 84.064,65.365 3.4,65.4 96.4,65.4 99.4,65.4 102.4,65.4 105.4,65.4 108.4,65.4 111.4,65.4 114.4,65.4 117.4,65.4 120.4,65.4 123.4,65.4 129.4,65.4 132.4,65.4 174.4,65.4 24.925,65.536 74.133,65.553 136.79,65.55 8.814,65.584 89.045,65.581 170.092,65.678 143.574,65.768 144.627,65.824 142.249,65.846 35.415,65.962 15.094,65.995 16.148,65.995 17.202,65.995 18.256,65.995 19.31,65.995 20.364,65.995 21.418,65.995 22.472,65.995 25.873,65.995 26.927,65.995 27.981,65.995 29.035,65.995 30.089,65.995 31.143,65.995 32.197,65.995 36.468,65.995 37.522,65.995 38.576,65.995 39.63,65.995 40.684,65.995 41.738,65.995 44.949,65.995 46.003,65.995 47.057,65.995 48.111,65.995 49.165,65.995 50.219,65.995 51.273,65.995 54.722,65.995 55.776,65.995 56.83,65.995 57.884,65.995 58.938,65.995 59.992,65.995 61.046,65.995 64.327,65.995 65.381,65.995 66.435,65.995 67.489,65.995 68.543,65.995 69.597,65.995 70.651,65.995 71.705,65.995 75.09,65.995 76.144,65.995 77.198,65.995 78.252,65.995 79.306,65.995 80.36,65.995 81.414,65.995 84.908,65.995 85.962,65.995 87.016,65.995 88.07,65.982 141.058,65.987 92.808,66.022 137.866,66.081 145.635,66.132 6.635,66.203 9.672,66.196 10.726,66.196 11.78,66.196 169.211,66.256 139.028,66.383 139.949,66.445 159.268,66.482 160.322,66.479 161.376,66.477 162.43,66.474 163.484,66.471 164.538,66.469 165.592,66.466 166.646,66.464 168.177,66.46 146.62,66.508 148.728,66.508 149.782,66.506 150.836,66.503 151.89,66.5 152.944,66.498 153.998,66.495 155.052,66.493 156.106,66.49 157.16,66.487 158.214,66.485 147.674,66.511 92.337,66.965 7.048,67.173 91.691,67.798 7.815,67.896 8.78,68.319 94.9,68.4 97.9,68.4 100.9,68.4 103.9,68.4 106.9,68.4 109.9,68.4 112.9,68.4 115.9,68.4 118.9,68.4 127.9,68.4 130.9,68.4 133.9,68.4 136.9,68.4 139.9,68.4 142.9,68.4 145.9,68.4 148.9,68.4 151.9,68.4 154.9,68.4 157.9,68.4 160.9,68.4 163.9,68.4 166.9,68.4 169.9,68.4 178.9,68.4 181.9,68.4 90.887,68.479 9.788,68.62 10.883,68.717 11.937,68.717 12.902,68.849 89.968,68.996 88.961,69.306 13.811,69.381 14.865,69.425 15.919,69.425 16.973,69.425 18.027,69.425 19.081,69.425 20.135,69.425 21.189,69.425 22.243,69.425 23.297,69.425 24.351,69.425 25.405,69.425 26.459,69.425 27.513,69.425 28.567,69.425 29.621,69.425 30.675,69.425 31.729,69.425 32.783,69.425 33.837,69.425 34.891,69.425 35.945,69.425 36.999,69.425 38.053,69.425 39.107,69.425 40.161,69.425 41.215,69.425 42.269,69.425 43.323,69.425 44.377,69.425 45.431,69.425 46.485,69.425 47.539,69.425 48.593,69.425 49.647,69.425 50.701,69.425 51.755,69.425 52.809,69.425 53.863,69.425 54.917,69.425 55.971,69.425 57.025,69.425 58.079,69.425 59.133,69.425 60.187,69.425 61.241,69.425 62.295,69.425 63.349,69.425 64.403,69.425 65.457,69.425 66.511,69.425 67.565,69.425 68.619,69.425 69.673,69.425 70.727,69.425 71.781,69.425 72.835,69.425 73.889,69.425 74.943,69.425 75.997,69.425 77.051,69.425 78.105,69.425 79.159,69.425 80.213,69.425 81.267,69.425 82.321,69.425 83.375,69.425 84.429,69.425 85.483,69.425 86.537,69.425 87.913,69.423
  other v2: 95.925,12.95 111,35.425 112.1,35.425 113.2,35.425 64.627,36.026 111,36.525 112.1,36.525 113.2,36.525 111,37.625 112.1,37.625 113.2,37.625 92.71,39.159 93.81,39.159 93.81,40.259 91.61,41.359 92.71,41.359 93.81,41.359 131.149,45.635
IN_5V: L30.1 XP2.9 XP4.9 | length 52.7
  Top Layer w0.25: L30.1@66.5,12.75 66.55,12.8 86.319,12.8 86.9,12.219 86.9,9.8 86.75,9.65 XP2.9@86.75,8 86.75,4.939 86.5,4.689 v1(86.5,4.526) ; v1(106.325,4.725) 106.477,4.725 107.75,5.998 XP4.9@107.75,8
  Bottom Layer w0.25: v1(86.5,4.526) 86.662,4.526 86.861,4.725 104.175,4.725 104.5,4.4 105.904,4.4 106.229,4.725 v1(106.325,4.725)
NetC1_1: C1.1 DA1.1 | length 1.6
  Top Layer w0.4: C1.1@81.75,42.935 81.75,44.075 81.9,44.225 DA1.1@81.9,44.45
NetC2_1: C2.1 DA1.5 | length 1.5
  Top Layer w0.4: DA1.5@82.85,47.3 82.895,47.345 82.895,48.755 C2.1@82.94,48.8
NetC2_2: C2.2 L1.1 | length 2.1
  Top Layer w0.4: C2.2@83.86,48.8 83.86,50.052 84.202,50.394 L1.1@84.582,50.394
NetC3_1: C3.1 C6.2 L1.2 L4.2 | length 6
  Top Layer w0.4: C6.2@81.76,51 81.87,51.11 81.87,52.99 L4.2@81.98,53.1 81.98,53.13 82.29,53.44 C3.1@84.1,53.44 84.1,52.484 84.41,52.174 L1.2@84.582,52.174
NetC3_2: C3.2 L2.1 | length 2.9
  Top Layer w0.4: L2.1@82.7,56.41 83.08,56.41 84.1,55.39 C3.2@84.1,54.36
NetC4_2: C4.2 DA2.1 | length 1.4
  Top Layer w0.4: DA2.1@83.05,63.652 83.075,63.676 83.075,65.015 C4.2@83.1,65.04
NetC5_1: C5.1 DA1.3 | length 1.4
  Top Layer w0.4: DA1.3@83.8,44.45 83.805,44.445 83.805,43.08 C5.1@83.81,43.075
NetC7_1: C7.1 DA2.4 R2.1 | length 26.7
  Top Layer w0.4: v1(79.689,60.922) 79.694,60.927 79.694,62.034 C7.1@79.7,62.04 ; v1@79.75,60.95 79.8,60.9 79.849,60.851 81.101,60.851 DA2.4@81.15,60.802
  Bottom Layer w0.2: v1(79.689,60.922) 79.822,60.922 80.6,61.7 84.886,61.7 85.88,60.706 85.88,48.88 84.5,47.5 R2.1@84.5,44.05
NetC8_1: C8.1 DA1.4 R1.1 | length 5.8
  Top Layer w0.4: DA1.4@83.8,47.3 83.813,47.287 85.138,47.287 85.15,47.275 v1(85.154,47.271) 85.2,47.225 85.2,46.245 C8.1@85.25,46.195
  Bottom Layer w0.2: v1(85.154,47.271) 85.269,47.156 85.269,46.601 85.4,46.471 R1.1@85.4,44.05
NetC9_2: C9.2 C10.2 DA3.6 DA3.7 DA3.8 DA3.9 DA3.13 L5.1 | length 23.4
  Top Layer w0.25: DA3.6@64.177,34.826 64.177,33.998 64.647,33.528 ; DA3.7@64.677,34.826 64.677,33.558 64.647,33.528 ; v1(64.8,32.7) 64.906,32.7 65.221,32.385 C10.2@65.959,32.385 C9.2@65.959,33.528 ; 65.177,33.528 DA3.8@65.177,34.826 ; DA3.9@65.677,34.826 65.677,33.81 C9.2@65.959,33.528 ; DA3.13@66.927,36.576 67.649,36.576 67.925,36.3 v1(67.925,36.275) ; v1(71.8,31.6) L5.1@73.738,31.6 ; 64.647,33.528 C9.2@65.959,33.528
  Bottom Layer w0.25: v1(64.8,32.7) 67.925,32.7 ; v1(67.925,36.275) 67.925,32.7 ; v1(71.8,31.6) 69.025,31.6 67.925,32.7
NetC11_1: C11.1 DA4.1 | length 1.4
  Top Layer w0.25: C11.1@14.089,27.8 14.089,29.151 DA4.1@14.155,29.217
NetC11_2: C11.2 R67.1 XW1.1 | length 9.5
  Top Layer w0.5: 11.6,26.824 14.033,26.824 C11.2@14.089,26.88
  Top Layer w2: XW1.1@4.633,26.824 11.6,26.824
NetC12_1: C12.1 C13.2 C19.2 L6.2 L7.1 | length 7.3
  Top Layer w0.25: L6.2@78.23,34.289 79.88,34.289 L7.1@80.135,34.544 ; C19.2@79.325,32.893 C13.2@80.564,32.893 80.135,33.322 L7.1@80.135,34.544 ; C12.1@80.976,36.195 80.976,35.426 80.83,35.28 80.52,35.28 80.135,34.895 L7.1@80.135,34.544
NetC12_2: C12.2 C18.2 DA3.14 L6.1 | length 13.5
  Top Layer w0.25: DA3.14@66.927,37.076 68.5,37.076 ; 74.562,36.06 C18.2@76.2,36.06 78.221,36.06 L6.1@78.23,36.069 78.356,36.195 C12.2@80.056,36.195
  Top Layer w0.8: 68.5,37.076 69.8,37.076
  Top Layer w2: 69.8,37.076 72.109,37.076 cw(c72.109,35.109) 73.5,36.5 ccw(c74.562,37.562) 74.562,36.06
NetC14_2: C14.2 DA3.4 R5.1 | length 5.3
  Top Layer w0.25: R5.1@59.815,34.486 59.815,35.639 C14.2@59.64,35.814 62.239,35.814 62.501,36.076 DA3.4@63.427,36.076
NetC15_2: C15.2 DA3.5 R6.1 R7.1 | length 5.3
  Top Layer w0.25: R6.1@60.831,34.486 61.436,34.486 ; C15.2@62.149,32.512 62.032,32.629 R7.1@62.032,33.655 61.857,33.83 61.857,34.065 61.436,34.486 ; DA3.5@63.427,35.576 62.531,35.576 62.394,35.439 62.389,35.439 61.436,34.486
NetC16_1: C16.1 DA3.2 | length 50.3
  Top Layer w0.4: C16.1@15.105,34.531 15.105,35.388 cw(c16.112,35.388) 15.4,36.1 cw(c16.366,35.134) 16.366,36.5 ; 57.061,37.716 57.1,37.7 61.634,37.7 cw(c61.634,36.334) 62.6,37.3 ccw(c63.141,37.841) 63.141,37.076 DA3.2@63.427,37.076
  Top Layer w2: 16.366,36.5 18.434,36.5 ccw(c18.434,37.866) 19.4,36.9 cw(c21.37,34.93) 21.37,37.716 57.061,37.716
NetC16_2: C16.2 DA4.5 | length 1.5
  Top Layer w0.25: DA4.5@15.105,32.067 C16.2@15.105,33.611
NetC17_1: C17.1 DA4.3 | length 1.4
  Top Layer w0.25: C17.1@15.994,27.8 15.994,29.156 DA4.3@16.055,29.217
NetC17_2: C17.2 XW2.1 | length 23.6
  Top Layer w0.8: 15.994,25.1 15.994,26.645 C17.2@16.009,26.66
  Top Layer w2: XW2.1@4.633,12.092 11.34,12.092 ccw(c11.34,14.632) 13.136,12.836 15.25,14.95 ccw(c13.454,16.746) 15.994,16.746 15.994,25.1
NetC21_1: C21.1 DA4.4 R8.1 | length 2.7
  Top Layer w0.25: DA4.4@16.055,32.067 17.625,32.067 C21.1@17.645,32.087 R8.1@17.645,30.965
NetC22_1: C22.1 DA4.6 R9.1 | length 4.1
  Top Layer w0.25: C22.1@12.565,31.579 R9.1@12.565,30.457 13.857,30.457 14.155,30.755 DA4.6@14.155,32.067
NetC23_1: C23.1 DA2.3 | length 1.5
  Top Layer w0.4: C23.1@81.04,65.1 81.04,63.987 81.15,63.877 DA2.3@81.15,63.652
NetC24_1: C24.1 DA1.6 R10.1 | length 5.5
  Top Layer w0.4: C24.1@80.45,46.335 80.57,46.455 80.57,46.987 80.75,47.167 v1(80.75,47.275) 80.763,47.287 81.888,47.287 DA1.6@81.9,47.3
  Bottom Layer w0.2: R10.1@80.6,44.05 80.75,44.2 v1(80.75,47.275)
NetC25_1: C25.1 DA2.6 R11.1 | length 24.3
  Top Layer w0.4: DA2.6@83.051,60.801 v1@84.499,60.801 ; v1(84.5,60.8) C25.1@84.5,61.94
  Bottom Layer w0.2: R11.1@79.7,44.05 79.7,49.5 80.3,50.1 80.3,50.616 80.302,50.618 80.302,60.802 80.875,61.375 83.925,61.375 v1(84.5,60.8)
NetC26_1: C26.1 DA5.1 | length 1.5
  Top Layer w0.4: DA5.1@4.75,44.175 4.75,43.01 C26.1@5,42.76
NetC27_2: C27.2 DA6.1 | length 1.5
  Top Layer w0.4: C27.2@7.7,64.04 7.725,64.015 7.725,62.628 DA6.1@7.75,62.603
NetC28_1: C28.1 DA5.3 | length 1.6
  Top Layer w0.3: DA5.3@6.65,44.175 6.65,43.95 6.854,43.746 6.884,43.746 7.06,43.57 C28.1@7.06,42.8
NetC29_1: C29.1 C35.1 C38.2 L3.1 | length 5.3
  Top Layer w0.4: C38.2@6.64,48.5 C29.1@5.66,48.5 5.66,49.98 L3.1@5.9,50.22 5.956,50.276 7.536,50.276 C35.1@8.1,50.84
NetC29_2: C29.2 DA5.5 | length 1.9
  Top Layer w0.3: C29.2@4.74,48.5 4.91,48.33 4.91,48.079 5.325,47.664 5.325,47.625 5.7,47.25 DA5.5@5.7,47.025
NetC30_2: C30.2 DA6.3 | length 1.5
  Top Layer w0.4: C30.2@5.64,64 5.64,63.038 5.85,62.828 DA6.3@5.85,62.603
NetC31_1: C31.1 DA7.1 | length 1.4
  Top Layer w0.4: C31.1@51.8,43.76 51.825,43.785 51.825,45.124 DA7.1@51.85,45.148
NetC32_1: C32.1 DA7.5 | length 1.3
  Top Layer w0.4: DA7.5@52.8,47.998 52.82,48.018 52.82,49.28 C32.1@52.84,49.3
NetC32_2: C32.2 L10.1 | length 2.1
  Top Layer w0.4: C32.2@53.76,49.3 53.76,50.6 54.07,50.91 L10.1@54.4,50.91
NetC33_1: C33.1 C37.2 L10.2 L12.2 | length 6.1
  Top Layer w0.4: C37.2@51.36,51.5 51.89,52.03 L12.2@51.89,53.3 51.89,53.63 52.2,53.94 C33.1@53.9,53.94 53.9,53 54.21,52.69 L10.2@54.4,52.69
NetC33_2: C33.2 C128.1 L11.1 | length 4.6
  Top Layer w0.3: L11.1@52.7,56.71 54.07,56.71 C128.1@54.6,57.24
  Top Layer w0.4: L11.1@52.7,56.81 52.826,56.684 52.826,55.934 53.78,54.98 C33.2@53.9,54.86
NetC34_2: C34.2 DA8.1 | length 1.4
  Top Layer w0.4: DA8.1@53.171,63.652 53.186,63.666 53.186,65.026 C34.2@53.2,65.04
NetC35_2: C35.2 C36.1 C39.2 L3.2 L8.1 | length 8
  Top Layer w0.4: L8.1@4.62,56.9 4.64,56.88 4.64,54.32 C39.2@4.66,54.3 C36.1@5.74,54.3 5.74,52.74 L3.2@5.9,52.58 6.066,52.414 7.446,52.414 C35.2@8.1,51.76
NetC36_2: C36.2 C40.2 DA6.5 L8.2 | length 6.7
  Top Layer w0.4: C36.2@6.66,54.3 7.2,54.3 ; DA6.5@6.8,59.753 6.89,59.663 6.89,56.99 L8.2@6.98,56.9 7.2,56.68 7.2,54.3 ; C40.2@7.74,54.3 7.2,54.3
NetC41_1: C41.1 DA5.4 R12.1 | length 7.6
  Top Layer w0.3: DA5.4@6.65,47.025 6.775,46.9 v1(8,46.9) 8.05,46.85 8.05,45.81 C41.1@8.1,45.76
  Bottom Layer w0.2: R12.1@6.4,42.55 6.4,45.3 v1(8,46.9)
NetC42_1: C42.1 DA5.6 R13.1 | length 3.8
  Top Layer w0.2: v1(3.8,46.8) 3.962,46.8 4.187,47.025 DA5.6@4.75,47.025
  Bottom Layer w0.2: R13.1@3.8,44.15 3.94,44.29 C42.1@3.94,45.5 3.8,45.64 v1(3.8,46.8)
NetC43_1: C43.1 DA7.3 | length 1.4
  Top Layer w0.4: DA7.3@53.75,45.148 53.75,44.923 53.86,44.813 C43.1@53.86,43.8
NetC44_1: C44.1 DA6.6 R14.2 | length 19.8
  Top Layer w0.4: DA6.6@7.75,59.753 7.807,59.696 9.143,59.696 9.218,59.622 9.218,58.518 v1(9.236,58.5)
  Bottom Layer w0.2: R14.2@8.2,42.55 8.2,43.7 9,44.5 9,47.244 8.341,47.902 8.341,49.281 8.936,49.876 8.936,54.88 8.675,55.141 8.675,55.659 9.013,55.997 9.013,58.115 9.236,58.338 v1(9.236,58.5)
NetC45_1: C45.1 DA6.4 R15.2 | length 26.2
  Top Layer w0.4: C45.1@4.4,60.84 v1(4.4,59.6) 4.508,59.6 4.661,59.753 DA6.4@5.85,59.753
  Bottom Layer w0.2: v1(4.4,59.6) 5.4,60.6 7.8,60.6 8.611,59.789 8.611,56.055 8.35,55.794 8.35,55.006 8.611,54.745 8.611,50.011 8,49.4 8,47.756 8.206,47.55 8.234,47.55 8.625,47.159 8.625,45.167 7.3,43.842 R15.2@7.3,42.55
NetC46_2: C46.2 DA8.3 | length 1.5
  Top Layer w0.4: C46.2@51.14,65.1 51.14,64.008 51.271,63.877 DA8.3@51.271,63.652
NetC47_1: C47.1 DA9.1 | length 1.4
  Top Layer w0.4: C47.1@11.2,41.46 11.225,41.485 11.225,42.787 DA9.1@11.25,42.812
NetC48_2: C48.2 DA10.1 | length 1.4
  Top Layer w0.4: DA10.1@13.447,63.652 13.474,63.678 13.474,65.013 C48.2@13.5,65.04
NetC49_1: C49.1 DA9.3 | length 1.5
  Top Layer w0.4: DA9.3@13.15,42.812 13.205,42.757 13.205,41.455 C49.1@13.26,41.4
NetC50_1: C50.1 DA11.5 | length 1.4
  Top Layer w0.4: C50.1@62.74,49.4 62.755,49.385 62.755,48.013 DA11.5@62.769,47.998
NetC50_2: C50.2 L18.1 | length 2
  Top Layer w0.4: C50.2@63.66,49.4 63.66,50.56 64.02,50.92 L18.1@64.4,50.92
NetC51_1: C51.1 C56.2 L18.2 L23.2 | length 6.1
  Top Layer w0.4: C56.2@61.66,51.2 61.725,51.265 61.725,52.935 L23.2@61.79,53 61.79,53.38 62.35,53.94 C51.1@63.9,53.94 63.9,53.01 64.21,52.7 L18.2@64.4,52.7
NetC51_2: C51.2 C181.1 L19.1 | length 4.4
  Top Layer w0.3: L19.1@63.05,56.44 64,56.44 C181.1@64.7,57.14
  Top Layer w0.4: L19.1@62.7,56.61 62.9,56.41 62.9,55.5 63.42,54.98 63.78,54.98 C51.2@63.9,54.86
NetC52_2: C52.2 DA12.1 | length 1.4
  Top Layer w0.4: DA12.1@63.05,63.652 63.075,63.677 63.075,65.015 C52.2@63.1,65.04
NetC53_1: C53.1 DA9.5 | length 1.6
  Top Layer w0.4: C53.1@12.1,47.24 12.15,47.19 12.15,45.712 DA9.5@12.2,45.662
NetC53_2: C53.2 L9.1 | length 2.7
  Top Layer w0.4: C53.2@12.1,48.16 12.18,48.24 14.62,48.24 L9.1@14.7,48.32
NetC54_1: C54.1 C61.2 L9.2 L14.1 | length 7.9
  Top Layer w0.4: C61.2@12.06,51.1 13,51.1 13.4,50.7 L9.2@14.47,50.7 ; L9.2@14.49,50.68 14.18,50.99 L14.1@14.18,53.8 14.18,54.03 14.49,54.34 C54.1@15.9,54.34
NetC54_2: C54.2 C135.1 L13.1 | length 7.9
  Top Layer w0.3: C135.1@11.2,56.54 11.74,56 15.324,56 15.5,56.176 15.5,56.291 15.544,56.336
  Top Layer w0.4: L13.1@15.19,56.83 L13.1@15.25,56.83 ; L13.1@15.28,57.9 15.28,56.83 15.544,56.83 15.544,56.336 15.9,55.98 C54.2@15.9,55.26
NetC55_2: C55.2 DA10.3 | length 1.4
  Top Layer w0.4: C55.2@11.34,65 11.34,64.084 11.547,63.877 DA10.3@11.547,63.652
NetC57_1: C57.1 DA7.4 R16.1 | length 6.4
  Top Layer w0.4: DA7.4@53.751,47.999 v1@55.099,47.999 ; v1(55.1,48) 55.15,47.95 55.15,47.11 C57.1@55.2,47.06
  Bottom Layer w0.2: v1(55.1,48) 55.1,47.838 55.4,47.538 R16.1@55.4,44.05
NetC58_1: C58.1 DA7.6 R17.1 | length 6.2
  Top Layer w0.4: C58.1@50.5,47.06 50.55,47.11 50.55,47.95 v1(50.6,48) DA7.6@51.85,47.998
  Bottom Layer w0.2: v1(50.6,48) 50.6,44.15 R17.1@50.7,44.05
NetC59_1: C59.1 DA8.6 R18.2 | length 24.1
  Top Layer w0.4: DA8.6@53.171,60.802 54.193,60.802 54.392,61 v1(54.5,61) 54.55,61.05 54.55,61.99 C59.1@54.6,62.04
  Bottom Layer w0.2: R18.2@49.8,44.05 49.8,60.1 51.25,61.55 53.95,61.55 v1(54.5,61)
NetC60_1: C60.1 DA8.4 R22.2 | length 26.7
  Top Layer w0.4: C60.1@49.8,62.04 v1(49.8,61.2) 49.877,61.123 51.171,61.123 51.271,61.023 DA8.4@51.271,60.802
  Bottom Layer w0.2: v1(49.8,61.2) 50.475,61.875 54.725,61.875 55.9,60.7 55.9,50.1 54.475,48.675 54.475,46.267 54.5,46.242 R22.2@54.5,44.05
NetC62_1: C62.1 DA11.1 | length 1.4
  Top Layer w0.4: C62.1@61.8,43.76 61.81,43.77 61.81,45.139 DA11.1@61.819,45.148
NetC63_1: C63.1 DA9.4 R19.1 | length 5.9
  Top Layer w0.4: DA9.4@13.15,45.662 14.354,45.662 14.492,45.8 v1(14.6,45.8) C63.1@14.6,44.66
  Bottom Layer w0.2: R19.1@14.5,42.55 14.6,42.65 v1(14.6,45.8)
NetC64_1: C64.1 DA9.6 R23.1 | length 5.9
  Top Layer w0.4: C64.1@9.8,44.96 v1(9.8,45.8) 9.877,45.723 10.289,45.723 10.35,45.662 DA9.6@11.25,45.662
  Bottom Layer w0.2: R23.1@9.1,42.55 9.1,43.4 9.8,44.1 v1(9.8,45.8)
NetC65_1: C65.1 DA11.3 | length 1.4
  Top Layer w0.4: DA11.3@63.719,45.148 63.719,44.923 63.86,44.783 C65.1@63.86,43.8
NetC66_1: C66.1 DA10.6 R24.2 | length 25.8
  Top Layer w0.4: DA10.6@13.447,60.802 14.493,60.802 14.692,61 v1(14.8,61) 14.85,61.05 14.85,61.99 C66.1@14.9,62.04
  Bottom Layer w0.2: R24.2@10,42.55 10,43.325 10.3,43.625 10.3,45.416 10.618,45.734 10.618,52.434 10.776,52.592 10.776,61.165 11.087,61.476 14.206,61.476 14.683,61 v1(14.8,61)
NetC67_1: C67.1 DA15.1 | length 1.4
  Top Layer w0.4: DA15.1@71.869,45.198 71.885,45.183 71.885,43.786 C67.1@71.9,43.77
NetC68_1: C68.1 DA15.5 | length 1.4
  Top Layer w0.4: DA15.5@72.819,48.048 72.83,48.059 72.83,49.439 C68.1@72.84,49.45
NetC68_2: C68.2 L20.1 | length 2.1
  Top Layer w0.4: C68.2@73.76,49.45 73.76,50.8 74.07,51.11 L20.1@74.4,51.11
NetC69_1: C69.1 DA10.4 R25.2 | length 28.4
  Top Layer w0.4: C69.1@10.1,62.04 10.126,62.014 10.126,61.026 v1(10.151,61) ; v1@10.176,61.024 10.235,61.024 10.458,60.802 DA10.4@11.547,60.802
  Bottom Layer w0.2: v1(10.151,61) 10.99,61.839 15.18,61.839 16.8,60.219 16.8,46.3 15.4,44.9 R25.2@15.4,42.55
NetC70_2: C70.2 DA16.1 | length 1.4
  Top Layer w0.4: C70.2@73.1,65.04 73.125,65.015 73.125,63.676 DA16.1@73.15,63.652
NetC71_2: C71.2 DA12.3 | length 1.5
  Top Layer w0.4: C71.2@61.04,65.1 61.04,63.987 61.15,63.877 DA12.3@61.15,63.652
NetC72_1: C72.1 DA13.1 | length 1.4
  Top Layer w0.4: C72.1@22.5,42.66 22.524,42.684 22.524,44.041 DA13.1@22.549,44.065
NetC75_2: C75.2 DA14.1 | length 1.4
  Top Layer w0.4: C75.2@23.9,65.04 23.931,65.009 23.931,63.682 DA14.1@23.961,63.652
NetC76_1: C76.1 DA13.3 | length 1.4
  Top Layer w0.4: DA13.3@24.449,44.065 24.505,44.01 24.505,42.755 C76.1@24.56,42.7
NetC77_1: C77.1 DA16.6 R21.2 | length 24
  Top Layer w0.4: DA16.6@73.15,60.802 74.193,60.802 74.392,61 v1(74.5,61) 74.55,61.05 74.55,61.99 C77.1@74.6,62.04
  Bottom Layer w0.2: R21.2@69.7,44.05 69.7,49.8 70.3,50.4 70.3,50.816 70.308,50.824 70.308,60.428 71.356,61.476 73.907,61.476 74.383,61 v1(74.5,61)
NetC78_1: C78.1 DA15.4 R20.1 | length 6.4
  Top Layer w0.4: DA15.4@73.769,48.048 v1(75.1,48.05) ; v1(75.1,48.05) 75.15,48 75.15,47.16 C78.1@75.2,47.11
  Bottom Layer w0.2: v1(75.1,48.05) 75.1,47.888 75.3,47.688 R20.1@75.3,44.05
NetC79_1: C79.1 DA13.5 | length 1.4
  Top Layer w0.4: C79.1@23.44,48.3 23.47,48.271 23.47,46.945 DA13.5@23.499,46.915
NetC79_2: C79.2 L15.1 | length 1.8
  Top Layer w0.4: C79.2@24.36,48.3 24.36,50 L15.1@24.4,50.04
NetC80_1: C80.1 C86.2 L15.2 L17.1 | length 6.8
  Top Layer w0.4: C86.2@21.76,52.8 22.446,53.486 22.446,54.456 L17.1@22.69,54.7 22.69,54.79 23,55.1 C80.1@24.24,55.1 24.24,52.56 L15.2@24.4,52.4
NetC80_2: C80.2 C200.1 L16.1 | length 7.4
  Top Layer w0.3: C200.1@20.7,56.44 21.46,56.44 21.762,56.138 25.07,56.138
  Top Layer w0.4: L16.1@24.98,57.9 25.07,57.81 25.07,56.138 25.07,55.19 C80.2@25.16,55.1